# EAGLE board LDC_Board (EAGLE 8.2.2)
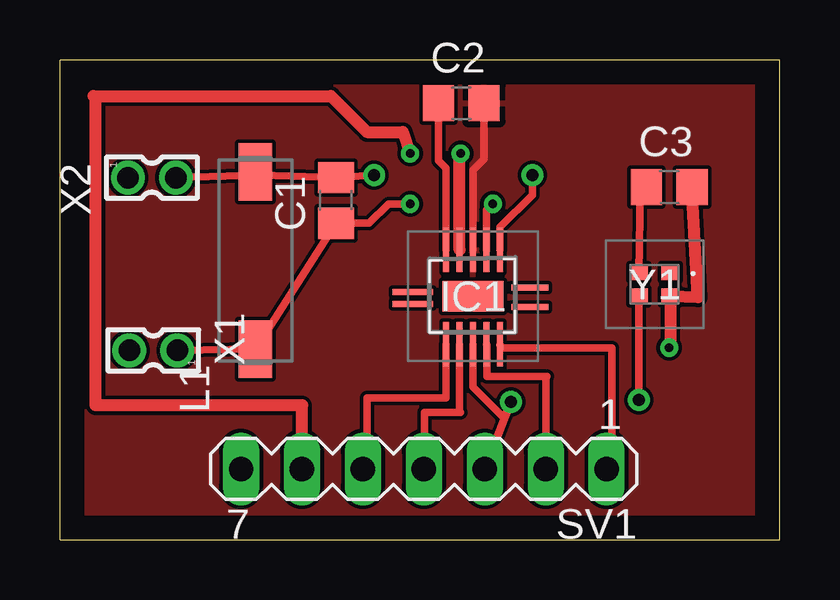
[diagram p0: board, top side]
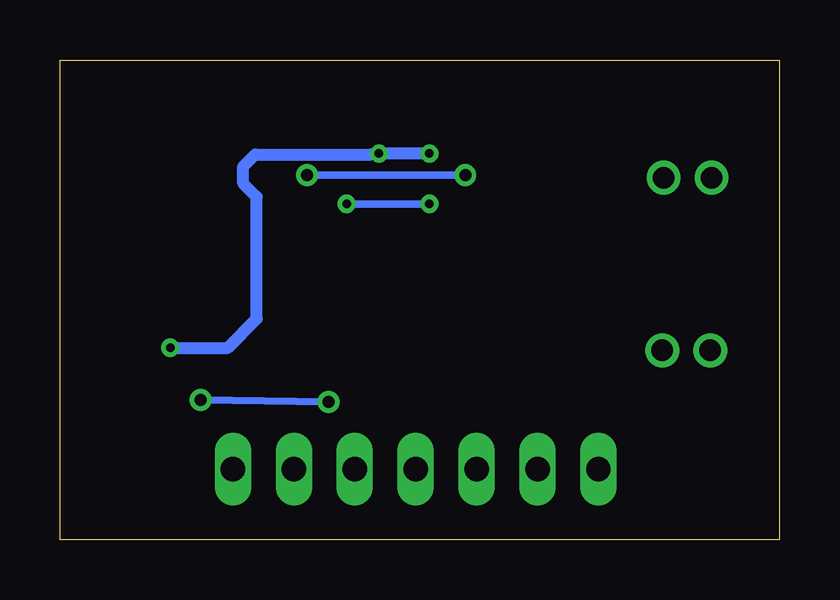
[diagram p1: board, bottom side, seen from below]

Size 30 x 20 mm. Coordinates in mm from the lower left corner, seen from the top.
Outline: 0,0 30,0 30,20 0,20 0,0
Copper layers (1*16): Top 0.035mm / dielectric 1.5mm / Bottom 0.035mm
Design rules "default": minimum track width 6mil, minimum drill 0.35mm, track to track 6mil, track to pad 6mil, pad to pad 6mil, via to via 6mil, smd to smd 6mil, copper to edge 40mil, drill to drill 6mil, minimum pad ring 10mil, minimum via ring 8mil, stop-mask expansion 4mil, vias tented up to drill 0mil, thermal gap 10mil

## Footprints (pad centres in the part's own frame; a part is rotated, then mirrored left to right if it is on the bottom)
C0805 = smd 1.3 x 1.5: 1 -0.95,0; 2 0.95,0
TPS74901DRCR = smd 1.85 x 0.25: 1 -2,1.125 | smd 1.85 x 0.24: 2 -2,0.562; 3 -2,0; 4 -2,-0.562; 5 -2,-1.125; 6 1.938,-1.125; 7 1.938,-0.562; 8 1.938,0; 9 1.938,0.562; 10 1.938,1.125 | smd 1.27 x 2.54: 11 0,0 | smd 0.25 x 1.7: 12 -0.312,2.513; 13 0.188,2.513 | smd 0.25 x 1.55: 14 -0.438,-2.37 | smd 0.25 x 1.53: 15 0.375,-2.37
L8530M = smd 2.4 x 1.4: 1 -3.7,0; 2 3.7,0
MA07-1 = drill 1.016 long: 1 -7.62,0; 2 -5.08,0; 3 -2.54,0; 4 0,0; 5 2.54,0; 6 5.08,0; 7 7.62,0
332-02 = drill 0.9 pad 1.27: 1 0,-1; 2 0,1
831066629 = smd 0.75 x 0.65: 1 -0.65,-0.5; 2 0.65,-0.5; 3 0.65,0.5; 4 -0.65,0.5

## Placement (x,y rotation side)
C1  [C0805]  11.5,14.14 90 top
C2  [C0805]  16.73,18.19 0 top
C3  [C0805]  25.4,14.7 0 top
IC1  [TPS74901DRCR]  17.22,10.14 90 top
L1  [L8530M]  8.15,11.64 90 top
SV1  [MA07-1]  15.17,2.94 180 top
X1  332-02  [332-02]  3.89,7.89 90 top
X2  332-02  [332-02]  3.83,15.09 270 top
Y1  831066629  [831066629]  24.79,10.64 180 top

## Library data of the parts
C1-C3 = rcl; SPICEPREFIX: C
IC1 = LDC1101DRCR; DESCRIPTION: 1.8V, High Resolution Inductance to Digital Converter; HEIGHT: mm; MANUFACTURER_NAME: Texas Instruments; MANUFACTURER_PART_NUMBER: LDC1101DRCR; MOUSER_PART_NUMBER: 595-LDC1101DRCR; MOUSER_PRICE-STOCK: https://www.mouser.co.uk/ProductDetail/Texas-Instruments/LDC1101DRCR?qs=GJ%2F2ZGcr5uOdE4MCIXn97A%3D%3D
L1 = rcl; SPICEPREFIX: L
SV1 = con-lstb; OC_FARNELL: unknown; OC_NEWARK: unknown
X1 X2 = con-garry
Y1 = 831066629; DESCRIPTION: Standard Clock Oscillators WE-SPXO 16.0MHz 50ppm 2.0 x 1.6mm; HEIGHT: 0.8mm; MANUFACTURER_NAME: Wurth Elektronik; MANUFACTURER_PART_NUMBER: 831066629; MOUSER_PART_NUMBER: 710-831066629; MOUSER_PRICE-STOCK: https://www.mouser.co.uk/ProductDetail/Wurth-Elektronik/831066629?qs=2WXlatMagcHA0ETpyr13Zw%3D%3D

## Nets
GND: C2.2 IC1.8
N$1: C1.2 IC1.6 L1.2 X2.2
N$2: C1.1 IC1.7 L1.1 X1.1
N$3: C3.1 Y1.2
N$4: C2.1 IC1.10
N$5: IC1.1 SV1.5
N$6: IC1.2 SV1.4
N$8: IC1.4 SV1.2
N$9: IC1.5 SV1.1
N$10: IC1.3 SV1.3 Y1.3
VCC: C3.2 IC1.9 SV1.6 Y1.4

## Tracks (layer width: path | path; a pad name or v marks a point on that pad's centre or on a via)
GND
  Top 0.305: IC1.8 17.22,15.41 17.67,15.87 C2.2
  pour Top: 0.2,19.8 0.5,0.2 29.8,0.2 29.8,19.8
N$1  (via drill 0.5)
  Top 0.305: 8.32,15.19 L1.2 | 8.32,15.19 C1.2 v13.1,15.2 | X2.2 8.32,15.19 | IC1.6 18.34,13.02 19.69,14.37 v19.69,15.19 v19.7,15.2
  Bottom 0.305: v13.1,15.2 v19.7,15.2
N$2  (via drill 0.35)
  Top 0.305: X1.1 L1.1 C1.1 12.89,13.19 13.7,14 v14.6,14 | IC1.7 17.78,13.73 v18.05,14
  Bottom 0.305: v14.6,14 17.47,14 v18.05,14
N$3
  Top 0.305: 24.05,11.23 arc90 Y1.2 24.2,14.6 C3.1
N$4
  Top 0.305: IC1.10 16.09,15.49 15.79,15.8 C2.1
N$5
  Top 0.305: SV1.5 arc-90 12.8,3.17 12.8,5.9 16.1,5.9 arc-90 16.09,5.91 IC1.1
N$6
  Top 0.305: SV1.4 arc-90 15.2,3.01 15.2,5.3 16.7,5.3 arc-90 16.66,5.34 IC1.2
N$8
  Top 0.305: SV1.2 20.25,6.75 20.3,6.8 17.8,6.8 17.8,8.12 IC1.4
N$9
  Top 0.305: SV1.1 arc90 23,3.15 23,8 18.48,8 arc-90 IC1.5
N$10  (via drill 0.5)
  Top 0.305: Y1.3 v24.13,5.83 | 18.53,5.06 v18.8,5.74 | 18.53,5.06 SV1.3 | IC1.3 17.22,6.37 18.53,5.06
  Bottom 0.305: v24.13,5.83 v18.8,5.74
VCC  (via drill 0.35)
  Top 0.5: Y1.4 26.6,10.1 C3.2
  Top 0.508: Y1.4 25.44,8.04 v25.4,8 | SV1.6 10.09,5.59 10.1,5.6 1.49,5.6 1.49,18.41 1.4,18.5 11.3,18.5 12.8,17 14.3,17 v14.6,16.1 | IC1.9 16.66,16.06 v16.7,16.1
  Bottom 0.508: v25.4,8 23,8 21.8,9.2 21.8,14.28 22.36,14.84 22.36,15.56 21.86,16.06 17.04,16.06 v16.7,16.1 v14.6,16.1